# Altium PCB Copy of ASCIIPCB2.pcbdoc (part 1 of 2)
Units mm, origin at the board's own origin, x right, y up, seen from the top; angles counter-clockwise.
Board outline 98.81 x 68.1 mm, 4 copper layers (Top Layer, Signal Layer 1, Signal Layer 2, Bottom Layer), stack 0.778 mm thick; 113 components, 59 nets, 280 pads, 406 vias.
Unrouted connection lines stored in the file: 16.
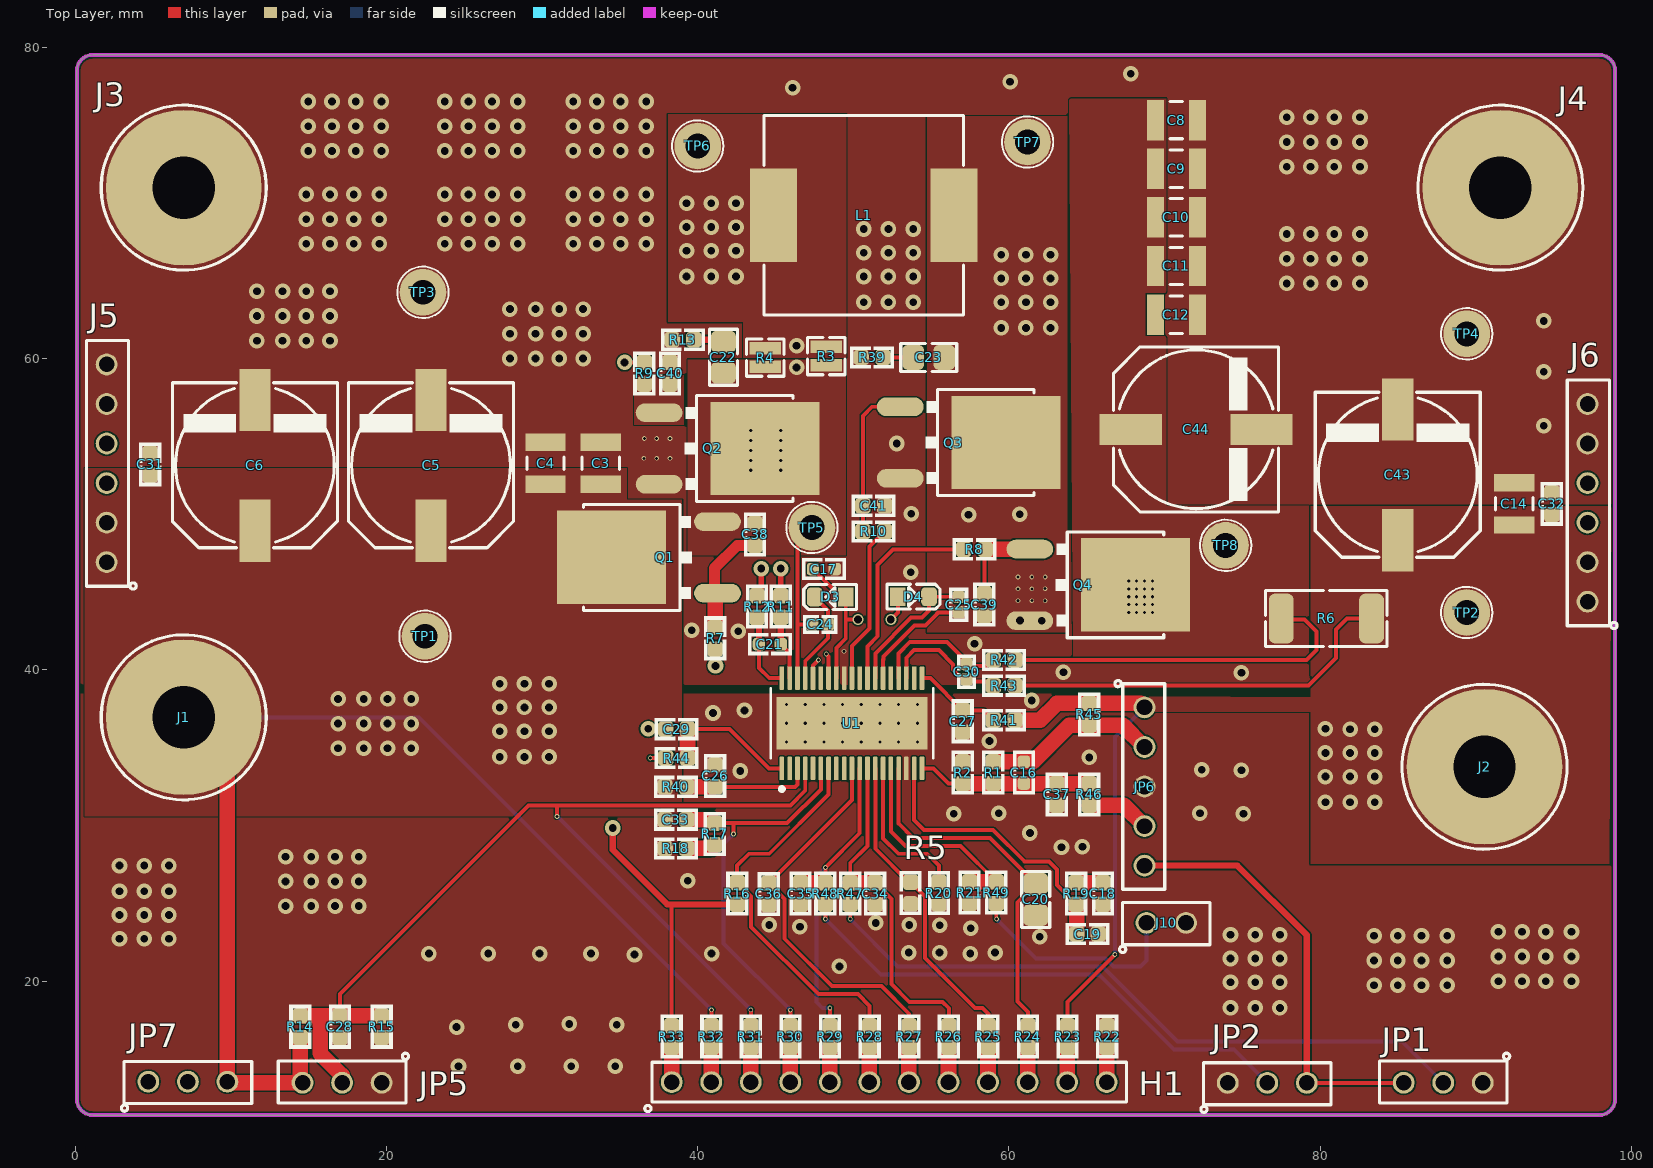
[diagram p0: Top Layer view]
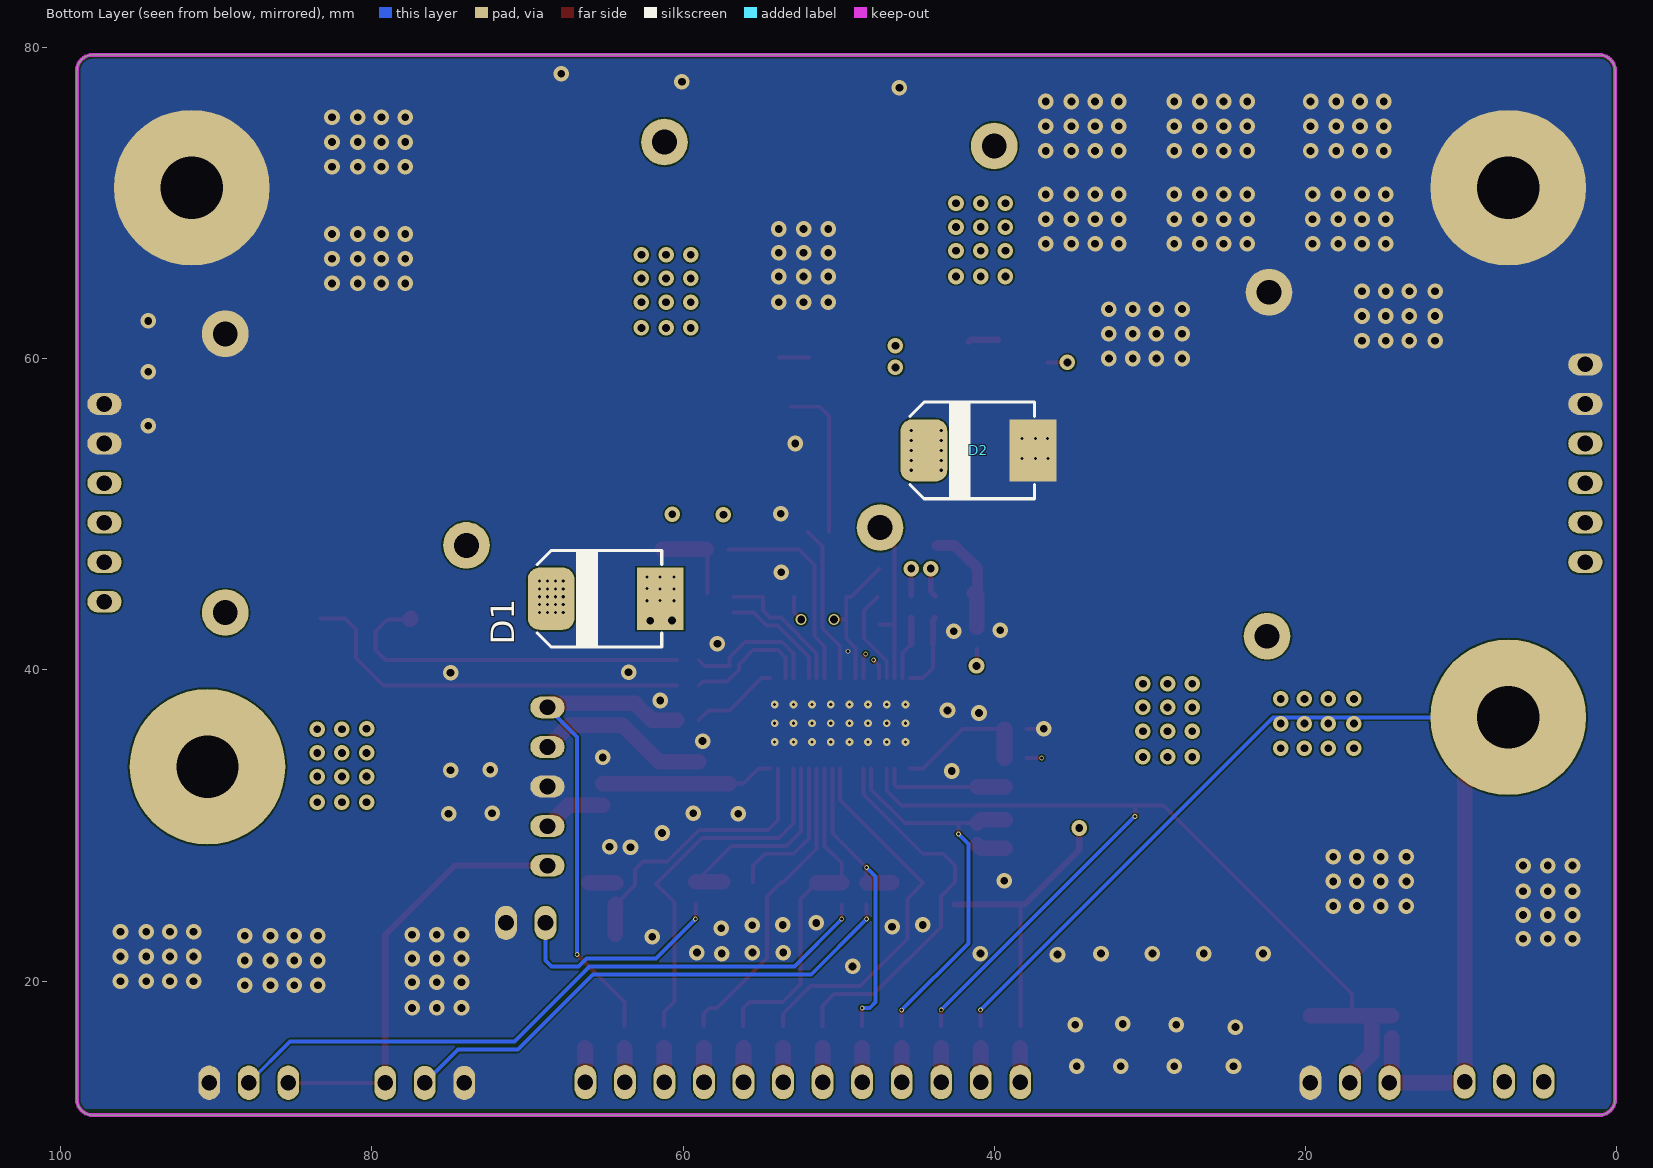
[diagram p1: Bottom Layer view, seen from below]
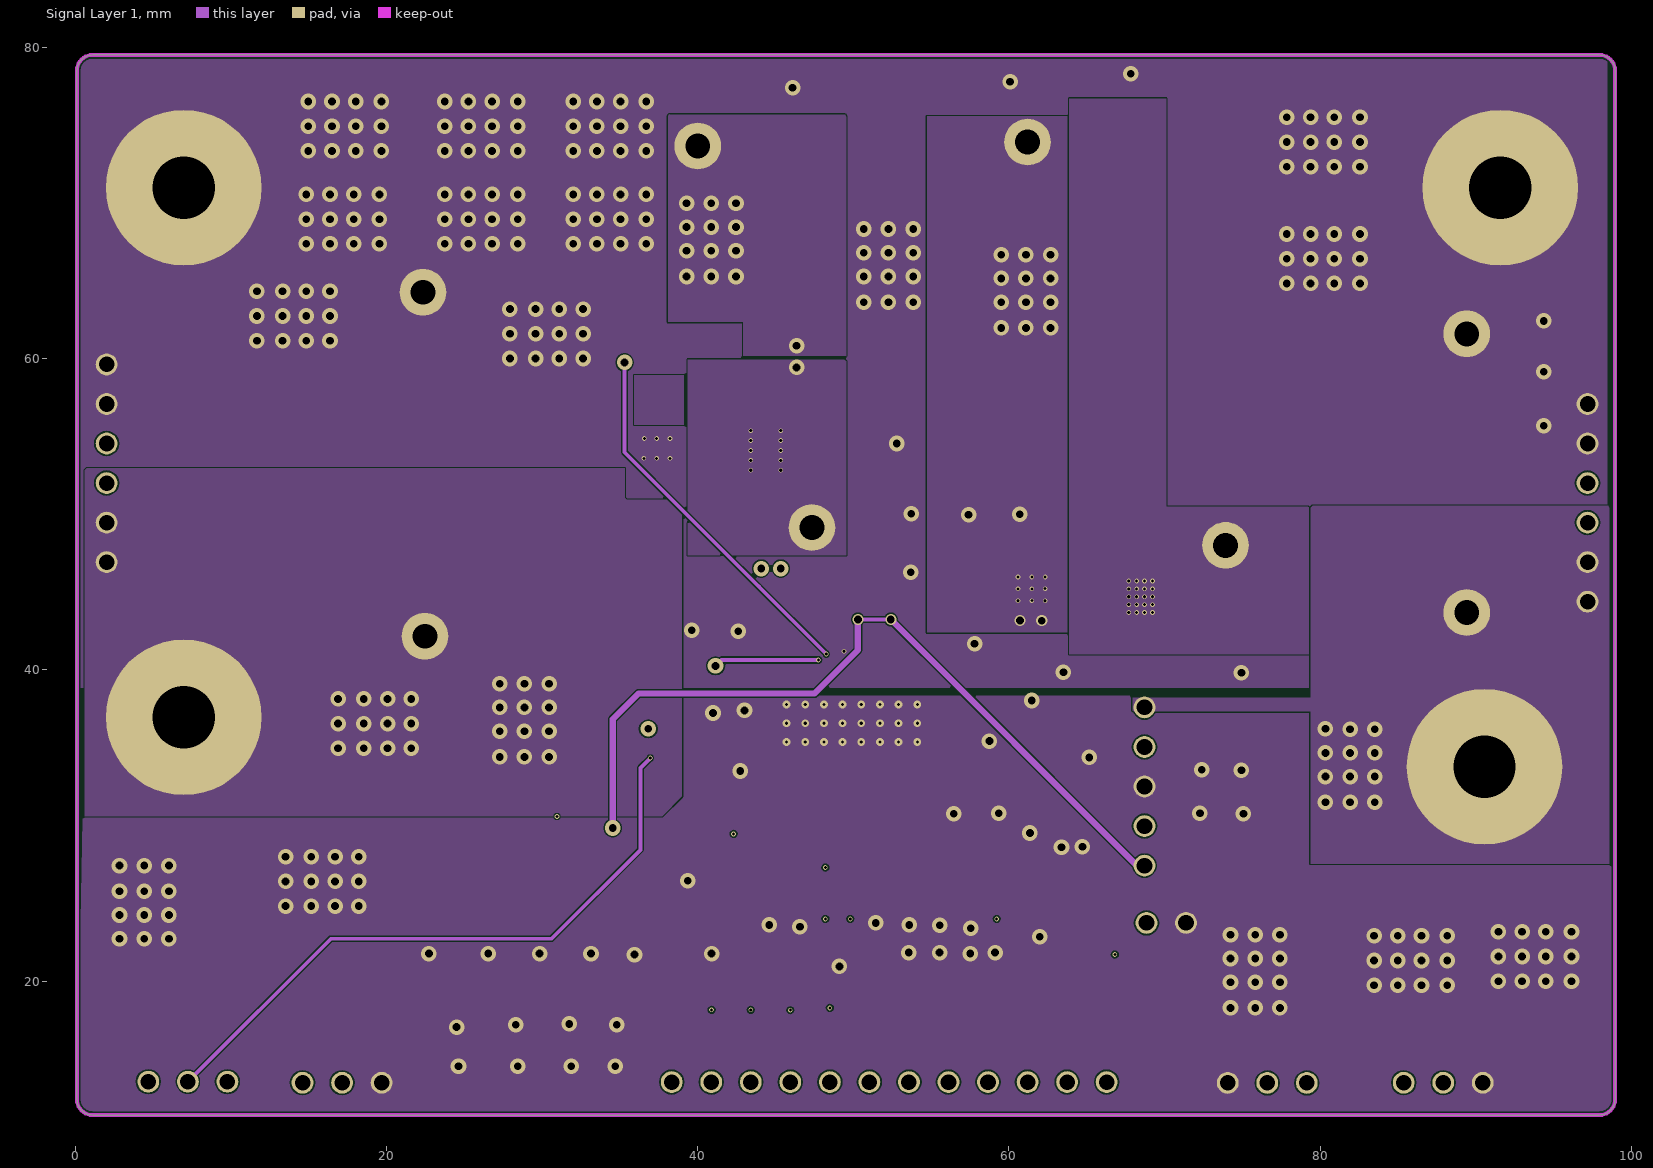
[diagram p2: Signal Layer 1]
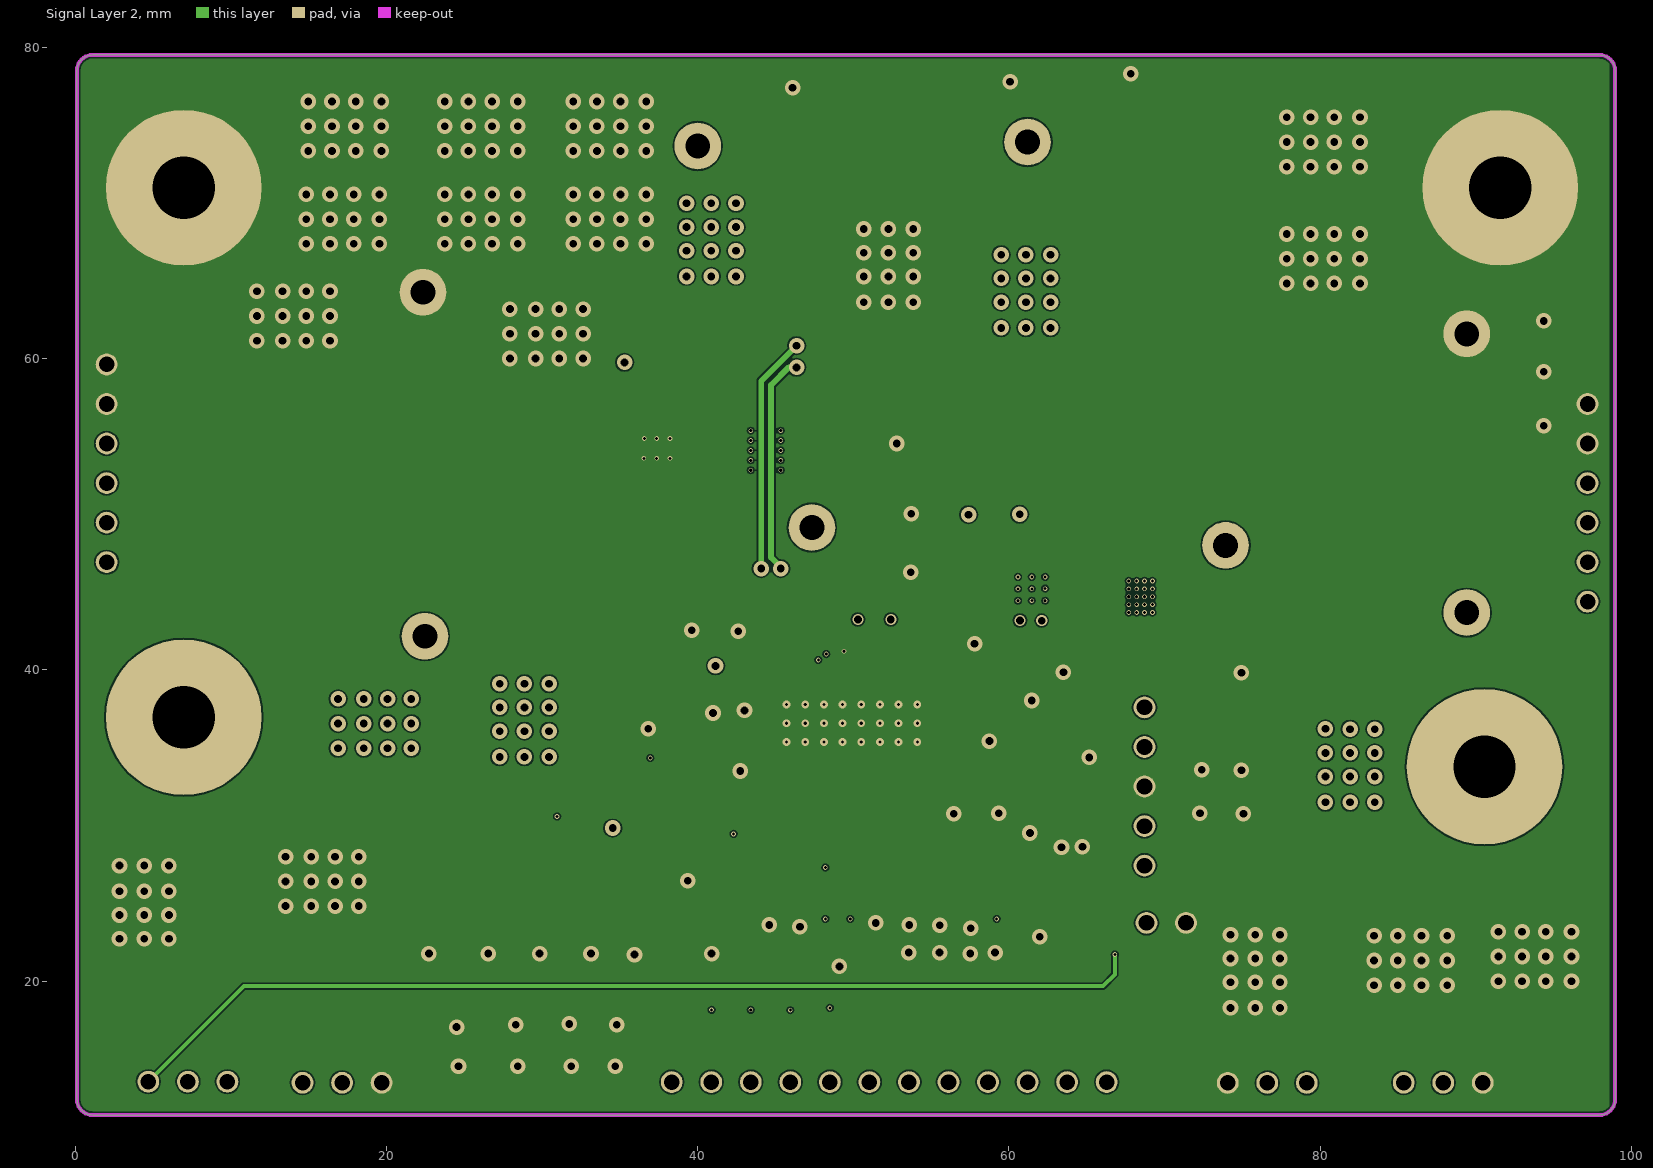
[diagram p3: Signal Layer 2]

## Layer stack, top to bottom
Top Solder: solder mask 0.0102, Solder Resist, Dk 3.5
Top Layer: signal copper 0.0356
Dielectric 1: core 0.254, FR-4, Dk 4.2
Signal Layer 1: signal copper 0.036
Dielectric 3: prepreg 0.127, Dk 4.2
Signal Layer 2: signal copper 0.036
Dielectric 2: core 0.254, Dk 4.2
Bottom Layer: signal copper 0.0356
Bottom Solder: solder mask 0.0102, Solder Resist, Dk 3.5

## Board outline
1.128,11.41 cw(c1.128,12.41) 0.127,12.41 0.127,78.506 cw(c1.128,78.506) 1.128,79.507 97.932,79.507 cw(c97.932,78.506) 98.933,78.506 98.933,12.41 cw(c97.932,12.41) 97.932,11.41
cut-out: 0.254,0 0.508,0 0.508,0.254 0.254,0.254
cut-out: 0.254,0 0.508,0 0.508,0.254 0.254,0.254

## Design rules (kind name [scope] priority, off if disabled: settings)
Clearance Clearance_LM5177 [InComponent('U1') vs InComponent('U1')] p1: gap=0.2 ignorepadtopadclearanceinfootprint=FALSE except(0: Arc-Hole Track-Hole SMDPad-Hole THPad-Hole Via-Hole Fill-Hole Poly-Hole Region-Hole Text-Hole)
Clearance [All] p2: gap=0.1 ignorepadtopadclearanceinfootprint=TRUE except(0: Arc-Hole Track-Hole SMDPad-Hole THPad-Hole Via-Hole Fill-Hole Poly-Hole Region-Hole Text-Hole)
DiffPairsRouting DiffPair_DiffPairsRouting [InDifferentialPair ('NewDifferentialPair1')] p1: maxlimit=0.254 minlimit=0.2 mostfreqgap=0.254 toplayer_minwidth=0.254 toplayer_maxwidth=0.381 toplayer_prefwidth=0.381 midlayer1_minwidth=0.254 midlayer1_maxwidth=0.381 midlayer1_prefwidth=0.381 midlayer2_minwidth=0.254 midlayer2_maxwidth=0.381 midlayer2_prefwidth=0.381 bottomlayer_minwidth=0.254 bottomlayer_maxwidth=0.381 bottomlayer_prefwidth=0.381 maxuncoupledlength=12.7
DiffPairsRouting [All] p2: maxlimit=0.254 minlimit=0.2 mostfreqgap=0.254 toplayer_minwidth=0.254 toplayer_maxwidth=0.381 toplayer_prefwidth=0.381 midlayer1_minwidth=0.254 midlayer1_maxwidth=0.381 midlayer1_prefwidth=0.381 midlayer2_minwidth=0.254 midlayer2_maxwidth=0.381 midlayer2_prefwidth=0.381 bottomlayer_minwidth=0.254 bottomlayer_maxwidth=0.381 bottomlayer_prefwidth=0.381 maxuncoupledlength=12.7
HoleSize [All] p1: absolutevalues=TRUE maxlimit=5 minlimit=0.025 maxpercent=80.000 minpercent=20.000
MatchedLengths DiffPair_MatchedLengths [InDifferentialPair ('NewDifferentialPair1')] p1: tolerance=25.4 checknetsindiffpair=FALSE checkdiffpairvsdiffpair=TRUE checkxsignals=TRUE checkothers=TRUE
MinimumSolderMaskSliver MinimumSolderMaskSliver_C0603D [HasFootprint('C0603D') vs HasFootprint('C0603D')] p1 off: minsoldermaskwidth=0
MinimumSolderMaskSliver [All] p2 off: minsoldermaskwidth=0.254
PolygonConnect [All] p1: connectstyle=Direct reliefconductorwidth=0.254 reliefentries=4 polygonreliefangle="90 Angle" airgapwidth=0.254
RoutingVias [All] p1: holewidth=0.711 width=1.27 viastyle="Through Hole" minholewidth=0.1 minwidth=0.1 maxholewidth=4 maxwidth=4
SilkToSolderMaskClearance SilkToSolderMaskClearance_C0603D [HasFootprint('C0603D') vs HasFootprint('C0603D')] p1 off: minsilkscreentomaskgap=0 clearancetoexposedcopper=TRUE
SilkToSolderMaskClearance [IsPad] p2 off: minsilkscreentomaskgap=0.254 clearancetoexposedcopper=TRUE
SolderMaskExpansion [All] p1: expansion=0.102
Width [All] p1: maxlimit=30 minlimit=0.254 preferedwidth=0.254 minimp=50.000000 maximp=50.000000 favimp=50.000000
26 further rules are at their usual default settings.

## Components (designator, comment, footprint, x,y, rotation, side; value= is the part's Value field where it differs from the comment)
C3 "GCM32EC71H106KA03L" C1210 33.782,53.276 r270 top value=10礔
C4 "GCM32EC71H106KA03L" C1210 30.226,53.276 r270 top value=10礔
C5 "100uF" C_EL_D10L10 22.873,53.149 r90 top
C6 "100uF" C_EL_D10L10 11.557,53.149 r90 top
C8 "GCM32EC71H106KA03L" C1210 70.752,75.329 r180 top value=10礔
C9 "GCM32EC71H106KA03L" C1210 70.752,72.202 r180 top value=10礔
C10 "GCM32EC71H106KA03L" C1210 70.752,69.078 r180 top value=10礔
C11 "GCM32EC71H106KA03L" C1210 70.752,65.951 r180 top value=10礔
C12 "GCM32EC71H106KA03L" C1210 70.752,62.824 r180 top value=10礔
C14 "GCM32EC71H106KA03L" C1210 92.456,50.673 r270 top value=10礔
C16 "GRM1885C2A200JA01D" C0603S 60.96,33.401 r270 top value=20pF
C17 "GRM188R60J476ME15D" C0603S 48.111,46.482 r180 top value=47uF
C18 "18nF" C0603D 66.04,25.638 r90 top
C19 "220pF" C0603D 65.044,23.036 r180 top
C20 "GCM21B5C1H183JA16L" C0805D 61.722,25.257 r90 top value=18nF
C21 "GCM1885C1H101JA16J" C0603S 44.639,41.656 r0 top value=100pF
C22 "GRM2165C1H681JA01D" C0805D 41.656,60.087 r270 top value=680pF
C23 "GRM2165C1H681JA01D" C0805D 54.848,60.079 r0 top value=680pF
C24 "0402BB104KW500" C0402D 47.871,42.926 r0 top value=0.1uF
C25 "0402BB104KW500" C0402D 56.769,44.196 r90 top value=0.1uF
C26 "GCM188L81H104KA57D" C0603D 41.128,33.197 r90 top
C27 "GCM188L81H104KA57D" C0603D 57.023,36.703 r270 top
C28 "GCM188L81H104KA57D" C0603D 17.018,17.08 r270 top
C29 "GCM188L81H104KA57D" C0603D 38.65,36.195 r0 top
C30 "0402BB104KW500" C0402D 57.273,39.879 r90 top value=0.1uF
C31 "GCM188L81H104KA57D" C0603D 4.826,53.211 r90 top
C32 "GCM188L81H104KA57D" C0603D 94.869,50.673 r90 top
C33 "06031C222JAT2A" C0603D 38.6,30.386 r0 top value=2200pF
C34 "06031C102JAT2A" C0603D 51.4,25.638 r270 top value=1000pF
C35 "06031C102JAT2A" C0603D 46.609,25.638 r270 top value=1000pF
C36 "06031C102JAT2A" C0603D 44.574,25.613 r270 top value=1000pF
C37 "GRM1885C1H151JA01D" C0603D 63.073,32.001 r270 top value=150pF
C38 "GRM188R72A103KA01D" C0603D 43.688,48.703 r90 top value=0.01uF
C39 "GRM188R72A103KA01D" C0603D 58.42,44.196 r90 top value=0.01uF
C40 "GRM188R72A103KA01D" C0603D 38.224,59.055 r270 top value=0.01uF
C41 "GRM188R72A103KA01D" C0603D 51.308,50.546 r180 top value=0.01uF
C43 "100uF" C_EL_D10L10 84.976,52.537 r90 top
C44 "100uF" C_EL_D10L10 72.022,55.458 r0 top
D1 "B560C" D_SMC 64.968,44.577 r0 bottom
D2 "B560C" D_SMC 41.021,54.102 r0 bottom
D3 "PMEG6010" D_SOD323 48.514,44.69 r180 top
D4 "PMEG6010" D_SOD323 53.864,44.704 r0 top
H1 "" HDR_F_1X12 52.304,13.525 r0 top
J1 "108-0740-001" BNANASKT_L_RED 6.985,36.957 r270 top
J2 "108-0740-001" BNANASKT_L_RED 90.551,33.782 r180 top
J3 "108-0740-001" BNANASKT_L_BLK 6.985,70.985 r0 top
J4 "108-0740-001" BNANASKT_L_BLK 91.567,70.985 r0 top
J5 "61300611121" HDR_F_1X6 2.032,53.276 r90 top
J6 "61300611121" HDR_F_1X6 97.168,50.736 r90 top
J10 "61300211121" HDR_F_1X2 70.104,23.749 r0 top
JP1 "61300311121" HDR_F_1X3 87.897,13.482 r180 top
JP2 "61300311121" HDR_F_1X3 76.594,13.47 r0 top
JP5 "61300311121" HDR_F_1X3 17.158,13.482 r180 top
JP6 "61300511121" HDR_F_1X5 68.707,32.512 r270 top
JP7 "61300311121" HDR_F_1X3 7.252,13.548 r0 top
L1 "APZBX1265M2R8" L_12 50.673,69.215 r0 top value=2.8uH
Q1 "NCEP0178AK" DPAK_3 41.275,47.23 r90 top
Q2 "NCEP0178AK" DPAK_3 37.523,54.229 r270 top
Q3 "NCEP0178AK" DPAK_3 53.017,54.61 r270 top
Q4 "NCEP0178AK" DPAK_3 61.341,45.466 r270 top
R1 "RC0603FR-0771K5L" R0603D 58.99,33.401 r270 top value=71.5k
R2 "4.75kΩ" R0603D 57.031,33.401 r270 top
R3 "KRL2012E-M-R004-F-T5" R0508 48.26,60.163 r90 top value=4m
R4 "KRL2012E-M-R004-F-T5" R0508 44.341,60.071 r90 top value=4m
R5 "RC0603FR-078K25L" R0603D 53.68,25.671 r90 top value=8.25k
R6 "6mΩ" R2512 80.391,43.307 r0 top
R7 "CRCW06033R00JNEA" R0603D 41.128,42.037 r90 top value=3.0
R8 "CRCW06033R00JNEA" R0603D 57.785,47.752 r0 top value=3.0
R9 "CRCW06033R00JNEA" R0603D 36.576,59.055 r90 top value=3.0
R10 "CRCW06033R00JNEA" R0603D 51.308,48.895 r0 top value=3.0
R11 "CRCW0603100RFKEAHP" R0603D 45.339,44.069 r90 top value=100
R12 "CRCW0603100RFKEAHP" R0603D 43.815,44.069 r90 top value=100
R13 "CRCW06033R00JNEA" R0603D 39.054,61.214 r0 top value=3.0
R14 "178kΩ" R0603D 14.478,17.08 r270 top
R15 "23.2kΩ" R0603D 19.698,17.08 r90 top
R16 "RT0603BRD0710KL" R0603D 42.549,25.638 r90 top value=10.0k
R17 "60kΩ" R0603D 41.09,29.464 r90 top
R18 "RMCF0603ZT0R00" R0603D 38.6,28.534 r0 top value=0
R19 "4.99kΩ" R0603D 64.319,25.638 r270 top
R20 "69.8kΩ" R0603D 55.499,25.663 r90 top
R21 "75kΩ" R0603D 57.466,25.694 r90 top
R22 "RMCF0603ZT0R00" R0603D 66.307,16.441 r270 top value=0
R23 "RMCF0603ZT0R00" R0603D 63.764,16.441 r270 top value=0
R24 "RMCF0603ZT0R00" R0603D 61.222,16.441 r270 top value=0
R25 "RMCF0603ZT0R00" R0603D 58.677,16.441 r270 top value=0
R26 "RMCF0603ZT0R00" R0603D 56.134,16.441 r270 top value=0
R27 "RMCF0603ZT0R00" R0603D 53.591,16.441 r270 top value=0
R28 "RMCF0603ZT0R00" R0603D 51.049,16.441 r270 top value=0
R29 "RMCF0603ZT0R00" R0603D 48.506,16.441 r270 top value=0
R30 "RMCF0603ZT0R00" R0603D 45.961,16.441 r270 top value=0
R31 "RMCF0603ZT0R00" R0603D 43.419,16.441 r270 top value=0
R32 "RMCF0603ZT0R00" R0603D 40.876,16.441 r270 top value=0
R33 "RMCF0603ZT0R00" R0603D 38.334,16.441 r270 top value=0
R39 "CRCW06033R00JNEA" R0603D 51.211,60.079 r0 top value=3.0
R40 "RMCF0603ZT0R00" R0603D 38.6,32.492 r180 top value=0
R41 "RMCF0603ZT0R00" R0603D 59.69,36.774 r0 top value=0
R42 "RMCF0603ZT0R00" R0603D 59.69,40.64 r0 top value=0
R43 "RMCF0603ZT0R00" R0603D 59.69,38.989 r0 top value=0
R44 "RMCF0603ZT0R00" R0603D 38.65,34.343 r180 top value=0
R45 "RC0603FR-0710RL" R0603D 65.151,37.149 r90 top value=10.0
R46 "RMCF0603ZT0R00" R0603D 65.151,32.004 r270 top value=0
R47 "RMCF0603ZT0R00" R0603D 49.803,25.638 r90 top value=0
R48 "RMCF0603ZT0R00" R0603D 48.206,25.638 r90 top value=0
R49 "RMCF0603ZT0R00" R0603D 59.183,25.694 r270 top value=0
TP1 "5010" TPTHD_C_BLK1 22.479,42.164 r180 top
TP2 "5013" TPTHD_C_BLK1 89.408,43.688 r0 top
TP3 "5011" TPTHD_C_BLK1 22.352,64.262 r180 top
TP4 "5011" TPTHD_C_BLK1 89.408,61.595 r0 top
TP5 "5012" TPTHD_C_BLK1 47.34,49.149 r0 top
TP6 "5012" TPTHD_C_BLK1 40.005,73.66 r0 top
TP7 "5128" TPTHD_C_BLK1 61.194,73.914 r0 top
TP8 "5013" TPTHD_C_BLK1 73.914,48.006 r0 top
U1 "LM5177DCPR" SOG50_38T 49.911,36.576 r90 top

## Footprints (in the part's own frame and the unit in brackets; to place one, negate y for a bottom-side part, rotate by r counter-clockwise, add the part's x,y. Pads: shape width x height; smd on the part's side, far side on the other; paste and mask are expansions set on the pad)
BNANASKT_L_BLK [mm] "Banana socket long black"
  round 10 hole 4: 1(0,0)
  silkscreen extent -5.3,-5.3 5.3,5.3, body extent -5.6,-5.6 5.6,12.01, height 21.64
BNANASKT_L_RED [mm] "Banana socket long Red"
  round 10 hole 4: 1(0,0)
  silkscreen extent -5.3,-5.3 5.3,5.3, body extent -5.6,-5.6 5.6,12.01, height 21.64
C0402D [mm] "CHIP Capacitor, 1.0X0.5mm, 0402, SMD (SolderMask Defined)"
  rrect50% 0.8x0.8 smd paste-2 mask-0.1: 1(-0.5,0) 2(0.5,0)
  silkscreen extent -1.1,-0.6 1.1,0.6, body extent -0.5,-0.26 0.5,0.27, height 0.36
C0603D [mm] "CHIP Capacitor, 1.6X0.8mm, 0603 , SMD (SolderMask Defined)"
  rrect50% 1x1 smd paste-0.5 mask-0.1: 1(-0.7,0) 2(0.7,0)
  silkscreen extent -1.4,-0.7 1.4,0.7, body extent -0.8,-0.4 0.8,0.4, height 0.9
C0603S [mm] "CHIP Capacitor, 1.6X0.8mm, 0603, soldered"
  rrect50% 0.8x0.8 smd paste-5 mask+0.075: 1(-0.7,0) 2(0.7,0)
  silkscreen extent -1.4,-0.7 1.4,0.7, body extent -1.23,-0.4 1.23,0.4, height 0.8
C0805D [mm] "CHIP Capacitor, 2.0X1.3mm, 0805, SMD (SolderMask Defined)"
  rrect50% 1.4x1.6 smd paste-5 mask-0.2: 1(-1,0) 2(1,0)
  silkscreen extent -1.8,-0.9 1.8,0.9, body extent -1,-0.62 1,0.63, height 1
C1210 [mm] "Chip Capacitor, Body 3.2x2.5mm, IPC High Density"
  rect 1.1x2.6 smd: 1(-1.35,0) 2(1.35,0)
  silkscreen extent -0.4,-1.2 0.4,1.2, body extent -1.7,-1.35 1.7,1.35, height 1.3
C_EL_D10L10 [mm] "Electrolytic Cap, 10.3mm, L: 10.2mm, size G"
  rect 4x2 smd paste-0.215: 1(-4.2,0) 2(4.2,0)
  silkscreen extent -5.3,-5.3 5.3,5.3, body extent -5.9,-5.25 5.9,5.25, height 10.5
D_SMC [mm] "SMC, Molded Diode, 7.0x6.0mm"
  rect 3x4 smd paste-3: 1(-3.5,0)
  rrect50% 3x4 smd paste-3: 2(3.5,0)
  silkscreen extent -3.6,-3.1 4.4,3.1, body extent -4.07,-3.05 4.06,3.05, height 2.4
D_SOD323 [mm] "DIODE0805, SOD-323, SC-76, DL-35, 0805 similar size"
  rect 1x1.2 smd paste-2 mask+0.075: 1(-1,0)
  rrect50% 1x1.2 smd paste-2 mask+0.075: 2(1,0)
  silkscreen extent -1.7,-0.8 1.7,0.8, body extent -1.25,-0.68 1.25,0.67, height 1
DPAK_3 [mm] "D-PAK (TO-252), 3-Pads, Body 6.2x6.7mm"
  oval 1.2x3 smd: 1(-2.3,0) 3(2.3,0)
  rect 6x7 smd paste-5: 4(0,6.8)
  silkscreen extent -3.4,1.63 3.4,8.6, body extent -3.37,-0.5 3.37,9.6, height 2.37
HDR_F_1X2 [mm] "HEADER FEMALE pitch: 2.54mm"
  round 1.4 / inner round 1.4 / far side oval 1.4x2.2 hole 1 mask+0.1: 1(-1.27,0) 2(1.27,0)
  silkscreen extent -3,-1.9 2.8,1.3, body extent -2.66,-1.3 2.67,1.2, height 8.5
HDR_F_1X3 [mm] "HEADER FEMALE pitch: 2.54mm"
  round 1.4 / inner round 1.4 / far side oval 1.4x2.2 hole 1 mask+0.1: 1(-2.54,0) 2(0,0) 3(2.54,0)
  silkscreen extent -4.27,-1.9 4.1,1.3, body extent -3.93,-1.3 3.94,1.2, height 8.5
HDR_F_1X5 [mm] "HEADER FEMALE pitch: 2.54mm"
  round 1.4 / inner round 1.4 / far side oval 1.4x2.2 hole 1 mask+0.1: 1(-5.08,0) 2(-2.54,0) 3(0,0) 4(2.54,0) 5(5.08,0)
  silkscreen extent -6.81,-1.9 6.6,1.3, body extent -6.47,-1.3 6.48,1.2, height 8.5
HDR_F_1X6 [mm] "HEADER FEMALE pitch: 2.54mm"
  round 1.4 / inner round 1.4 / far side oval 1.4x2.2 hole 1 mask+0.1: 1(-6.35,0) 2(-3.81,0) 3(-1.27,0) 4(1.27,0) 5(3.81,0) 6(6.35,0)
  silkscreen extent -8.08,-1.9 7.9,1.3, body extent -7.74,-1.3 7.75,1.2, height 8.5
HDR_F_1X12 [mm]
  round 1.4 / inner round 1.4 / far side oval 1.4x2.2 hole 1: 1(-13.97,0) 2(-11.43,0) 3(-8.89,0) 4(-6.35,0) 5(-3.81,0) 6(-1.27,0) 7(1.27,0) 8(3.81,0) 9(6.35,0) 10(8.89,0) 11(11.43,0) 12(13.97,0)
  silkscreen extent -15.7,-1.9 15.24,1.27, body extent -15.24,-1.27 15.24,1.27, height 8.5
L_12 [mm] "INDUCTOR, 13.5x12.5mm, DR125, CDRH127, D128C 931AS"
  rect 3x6 smd paste-4: 1(-5.8,0) 2(5.8,0)
  silkscreen extent -6.4,-6.4 6.4,6.4, body extent -6.16,-6.15 6.16,6.15, height 8.16
R0508 [mm] "CHIP Resistor, 1.3X2.0mm, 0508"
  rect 0.8x2 smd: 1(-0.6,0) 2(0.6,0)
  silkscreen extent -1.2,-1.2 1.2,1.2, body extent -0.67,-1.05 0.68,1.05, height 0.7
R0603D [mm] "CHIP Resistor 1/10 WATT, 1.6x0.8mm, 0603, SMD (SolderMask Defined)"
  rrect50% 1x1 smd paste-0.5 mask-0.1: 1(-0.7,0) 2(0.7,0)
  silkscreen extent -1.4,-0.7 1.4,0.7, body extent -0.85,-0.4 0.85,0.4, height 0.56
R2512 [mm] "CHIP RESISTOR 1 WATT, 6.4X3.2mm, 2512, 6432"
  rrect50% 1.6x3.2 smd: 1(-2.9,0) 2(2.9,0)
  silkscreen extent -3.9,-1.8 3.9,1.8, body extent -3.17,-1.5 3.18,1.5, height 1.6
SOG50_38T [mm]
  rrect33% 1.5x0.3 smd paste+0 mask+0: 1(-2.9,4.5) 2(-2.9,4) 3(-2.9,3.5) 4(-2.9,3) 5(-2.9,2.5) 6(-2.9,2) 7(-2.9,1.5) 8(-2.9,1) 9(-2.9,0.5) 10(-2.9,0) 11(-2.9,-0.5) 12(-2.9,-1) 13(-2.9,-1.5) 14(-2.9,-2) 15(-2.9,-2.5) 16(-2.9,-3) 17(-2.9,-3.5) 18(-2.9,-4) 19(-2.9,-4.5) 20(2.9,-4.5) 21(2.9,-4) 22(2.9,-3.5) 23(2.9,-3) 24(2.9,-2.5) 25(2.9,-2) 26(2.9,-1.5) 27(2.9,-1) 28(2.9,-0.5) 29(2.9,0) 30(2.9,0.5) 31(2.9,1) 32(2.9,1.5) 33(2.9,2) 34(2.9,2.5) 35(2.9,3) 36(2.9,3.5) 37(2.9,4) 38(2.9,4.5)
  rrect3% 3.4x9.7 smd paste-1000 mask-1000: 39(0,0)
  silkscreen extent -4.35,-5.23 2.25,5.23, body extent -3.75,-5.15 3.75,5.15, height 0.25
TPTHD_C_BLK1 [mm] "Thru-hole test point loop, 1.6mm Hole"
  round 3 hole 1.6: 1(0,0)
  silkscreen extent -1.65,-1.65 1.65,1.65, body extent -1.6,-1.6 1.6,1.59, height 8.09

## Part data
C3 C4 C8 C9 C10 C11 C12 C14: library part CMP-0092251-1, "Ceramic Capacitor for Automotive 10uF -10% 50VDC X7S 1210 Embossed T/R", Manufacturer=Murata, Operating Temperature Range="-55癈 to +125癈", TempCo=22%, Temperature Characteristic=X7S, Tolerance_%=10%, ValueDisplayed=10uF, AddInBom=yes, AEC Grade="Grade 1", AEC Qualified=Yes, Cap_F=10礔, ComponentLink1Description=Datasheet, ComponentLink1URL=https://www.murata.com/en-us/products/productdetail?partno=GCM32EC71H106KA03%23, Datasheet=https://www.murata.com/en-us/products/productdetail?partno=GCM32EC71H106KA03%23, Datasheet Path=datasheets/Cap-GCM32EC71H106KA03L.pdf, DesignItemID=CMP-0092251-1, Device=CMP-0092251-1, FootprintName=FP-GCM32EC71H106KA03L_1210-MFG, helpURL=https://upverter.com/upn/revision/edd6109eef88ffd0/, Lead Free=Yes, LibraryName="Altium Vault - TI", Origin Footprint=FP-GCM32EC71H106KA03L_1210-IPC_C, OriginFootprint 2=FP-GCM32EC71H106KA03L_1210-IPC_B, OriginFootprint 3=FP-GCM32EC71H106KA03L_1210-IPC_A, OriginModelName=Cap_GCM32EC71H106KA03L_1210, PackageReference=1210, Part Number=GCM32EC71H106KA03L, PartNumber=GCM32EC71H106KA03L, RoHS=TRUE, SizeZ_mm=2.7mm, Symbol=CMP-0092251-1, VDC_V=50V
  C3: UniqueId=cc82bf2c2e22e605
  C4: UniqueId=3a68d3ddabf48558
  C8: UniqueId=80f3708378e3d903
  C9: UniqueId=7ddfd2f632a8b17d
  C10: UniqueId=3e75135af30e0f04
  C11: UniqueId=20764de07767b3a1
  C12: UniqueId=26a39bcafcc8ce7c
  C14: UniqueId=00361082df9d4549
C5 C6 C43 C44: library part MA63V100M10X10, "容值:100uF;精度:±20%;额定电压:63V;纹波电流:3.1A@100kHz;等效串联电阻(ESR):30mΩ@100kHz;类型:聚合物;"
C16: library part CMP-0007253-4, "CAP, CERM, 20 pF, 100 V, +/- 5%, C0G/NP0, 0603", Cap_Case=0603, Manufacturer=MuRata, Supplier Part Number 1=490-1334-1-ND, TempCo=C0G/NP0, Tolerance_%=5%, Value1=Unknown, Value2=100V, ValueDisplayed=20pF, AddInBom=yes, AEC Category=Q200, AEC Qualified=?, Cap_F=20pF, ComponentLink1Description="Datasheet link", ComponentLink1URL=http://search.murata.co.jp/Ceramy/PnsearchViewAction.do?HnOFG=ON&HnNFG=ON&SEL_CNT=50&sLang=en&sKey=GRM1885C2A200JA01D&x=9&y=9&search=startwith, CompType=Capacitor, DesignItemID=CMP-0007253-4, Device=CMP-0007253-4, FootprintName=0603S, LatestRevisionDate=2017-03-09, LibraryName="Altium Vault - TI", MountType=SMT, Origin Footprint=0603, OriginFootprint 2=0603_HV, OriginFootprint 3=0603L, OriginFootprint 4=0603M, PackageReference=0603, PartNumber=GRM1885C2A200JA01D, Polarized=N, Published=2008-06-19, Publisher="Texas Instruments", RoHS=Y, SizeArea_mm2=1.28, SizeAreaWB_mm2=4.68, SizeX_mm=1.6, SizeY_mm=0.8, SizeZ_mm=1, Supplier 1=Digi-Key, Supplier 2=Mouser, Supplier Part Number 2=81-GRM1885C2A200JA1D, Symbol=CMP-0007253-4, TaMax_C=125癈, TaMin_C=-55癈, Technology=Ceramic, U/M=EA, UniqueId=c8e923f96b539988, VDC_V=100V
C17: library part CMP-0007313-5, "CAP, CERM, 47 uF, 6.3 V, +/- 20%, X5R, 0603", Cap_Case=0603, Manufacturer=MuRata, TempCo=X5R, Tolerance_%=20%, Value1=Unknown, Value2=6.3V, ValueDisplayed=47uF, AddInBom=yes, AEC Category=Q200, AEC Qualified=?, Cap_F=47礔, ComponentLink1Description="Datasheet link", ComponentLink1URL=http://psearch.en.murata.com/capacitor/product/GRM188R60J476ME15%23.pdf, CompType=Capacitor, DesignItemID=CMP-0007313-5, Device=CMP-0007313-5, FootprintName=0603S, LatestRevisionDate=2017-03-09, LibraryName="Altium Vault - TI", MountType=SMT, Origin Footprint=0603, OriginFootprint 2=0603_HV, OriginFootprint 3=0603L, OriginFootprint 4=0603M, PackageReference=0603, PartNumber=GRM188R60J476ME15D, Polarized=N, Published=2008-06-19, Publisher="Texas Instruments", RoHS=Y, SizeArea_mm2=1.28, SizeAreaWB_mm2=4.68, SizeX_mm=1.6, SizeY_mm=0.8, SizeZ_mm=1, Symbol=CMP-0007313-5, TaMax_C=85癈, TaMin_C=-55癈, Technology=Ceramic, U/M=EA, UniqueId=48700c84863a802e, VDC_V=6.3V
C18: library part CC0603KRX7R9BB183, "容值:18nF;精度:±10%;额定电压:50V;温度系数:X7R;", JLCPCB Part Class="Extended Part", LCSC Part Name="18nF ±10% 50V", Manufacturer=YAGEO(国巨), Temperature Coefficient=X7R, Tolerance=±10%, Voltage Rating=50V, 3D Model=ac125912035d415993ca9572d50418b1, 3D Model Transform=62.992,31.496,0,0,0,0,0,0,0, Add into BOM=yes, Convert to PCB=yes, Datasheet=https://item.szlcsc.com/datasheet/CC0603KRX7R9BB183/108295.html, Device=CC0603KRX7R9BB183, FootprintName=C0603, Manufacturer Part=CC0603KRX7R9BB183, ModelName=C0603_L1.6-W0.8-H0.8, Supplier=LCSC, Supplier Footprint=0603, Supplier Part=C107079, Symbol=CC0603KRX7R9BB183
C19: library part CC0603JRNPO9BN221, "容值:220pF;精度:±5%;额定电压:50V;温度系数:NP0;", JLCPCB Part Class="Extended Part", LCSC Part Name="220pF ±5% 50V", Manufacturer=YAGEO(国巨), Temperature Coefficient=NP0, Tolerance=±5%, Voltage Rating=50V, 3D Model=ac125912035d415993ca9572d50418b1, 3D Model Transform=62.992,31.496,0,0,0,0,0,0,0, Add into BOM=yes, Convert to PCB=yes, Datasheet=https://item.szlcsc.com/datasheet/CC0603JRNPO9BN221/107425.html, Device=CC0603JRNPO9BN221, FootprintName=C0603, Manufacturer Part=CC0603JRNPO9BN221, ModelName=C0603_L1.6-W0.8-H0.8, Supplier=LCSC, Supplier Footprint=0603, Supplier Part=C106210, Symbol=CC0603JRNPO9BN221
C20: library part CMP-0092440-1, "Ceramic Capacitor for Automotive 18nF -5% 50VDC C0G 0805 Embossed T/R", Manufacturer=Murata, Operating Temperature Range="-55癈 to +125癈", TempCo=30ppm/癈, Temperature Characteristic=C0G, Tolerance_%=5%, ValueDisplayed=18nF, AddInBom=yes, AEC Grade="Grade 1", AEC Qualified=Yes, Cap_F=18nF, ComponentLink1Description=Datasheet, ComponentLink1URL=https://www.murata.com/en-us/products/productdetail?partno=GCM21B5C1H183JA16%23, Datasheet=https://www.murata.com/en-us/products/productdetail?partno=GCM21B5C1H183JA16%23, Datasheet Path=datasheets/Cap-GCM21B5C1H183JA16L.pdf, DesignItemID=CMP-0092440-1, Device=CMP-0092440-1, FootprintName=FP-GCM21B5C1H183JA16L_0805-MFG, helpURL=https://upverter.com/upn/revision/286cb77b29c01871/, Lead Free=Yes, LibraryName="Altium Vault - TI", Origin Footprint=FP-GCM21B5C1H183JA16L_0805-IPC_C, OriginFootprint 2=FP-GCM21B5C1H183JA16L_0805-IPC_B, OriginFootprint 3=FP-GCM21B5C1H183JA16L_0805-IPC_A, OriginModelName=Cap_GCM21B5C1H183JA16L_0805, PackageReference=0805, Part Number=GCM21B5C1H183JA16L, PartNumber=GCM21B5C1H183JA16L, RoHS=TRUE, SizeZ_mm=1.4mm, Symbol=CMP-0092440-1, UniqueId=97d7532320e593d5, VDC_V=50V
C21: library part CMP-0750041-1, "CAP, CERM, 100 pF, 50 V,+/- 5%, C0G/NP0, AEC-Q200 Grade 1, 0603", Cap_Case=0603, Manufacturer=MuRata, TempCo=C0G/NP0, Tolerance_%=5%, Value2=50V, ValueDisplayed=100pF, AddInBom=yes, AEC Category=Q200, AEC Grade=1, AEC Qualified=Y, Cap_F=100pF, ComponentLink1Description="Datasheet link", ComponentLink1URL=https://psearch.en.murata.com/capacitor/product/GCM1885C1H101JA16%23.pdf, CompType=Capacitor, DesignItemID=CMP-0750041-1, Device=CMP-0750041-1, FootprintName=0603S, LibraryName="Altium Vault - TI", MountType=SMT, Origin Footprint=0603, OriginFootprint 2=0603M, OriginFootprint 3=0603L, OriginFootprint 4=0603_HV, PackageReference=0603, PartNumber=GCM1885C1H101JA16J, Polarized=N, RoHS=Y, SizeArea_mm2=1.28, SizeAreaWB_mm2=4.68, SizeX_mm=1.6, SizeY_mm=0.8, SizeZ_mm=1, Symbol=CMP-0750041-1, TaMax_C=125癈, TaMin_C=-55癈, Technology=Ceramic, U/M=EA, UniqueId=0259cc883dd91c7a, VDC_V=50V
C22 C23: library part CMP-0008089-2, "CAP, CERM, 680 pF, 50 V, +/- 5%, C0G/NP0, 0805", Cap_Case=0805, Manufacturer=MuRata, Supplier Part Number 1=490-1619-1-ND, TempCo=C0G/NP0, Tolerance_%=5%, Value1=Unknown, Value2=50V, ValueDisplayed=680pF, AddInBom=yes, AEC Category=Q200, AEC Qualified=?, Cap_F=680pF, ComponentLink1Description="Datasheet link", ComponentLink1URL=http://search.murata.co.jp/Ceramy/PnsearchViewAction.do?HnOFG=ON&HnNFG=ON&SEL_CNT=50&sLang=en&sKey=GRM2165C1H681JA01D&x=9&y=9&search=startwith, CompType=Capacitor, DesignItemID=CMP-0008089-2, Device=CMP-0008089-2, FootprintName=0805_HV1, LatestRevisionDate=2017-03-09, LibraryName="Altium Vault - TI", MountType=SMT, Origin Footprint=0805_HV, OriginFootprint 2=0805M, OriginFootprint 3=0805, OriginFootprint 4=0805L, PackageReference=0805, PartNumber=GRM2165C1H681JA01D, Polarized=N, Published=2008-06-19, Publisher="Texas Instruments", RoHS=Y, SizeArea_mm2=2.5, SizeAreaWB_mm2=6.75, SizeX_mm=2, SizeY_mm=1.25, SizeZ_mm=1.45, Supplier 1=Digi-Key, Supplier 2=Mouser, Supplier Part Number 2=81-GRM40C681J50D, Symbol=CMP-0008089-2, TaMax_C=125癈, TaMin_C=-55癈, Technology=Ceramic, U/M=EA, VDC_V=50V
  C22: UniqueId=7f35450ac3171d20
  C23: UniqueId=8bc5c1e1749a19fa
C24 C30: library part CMP-0860983-1, "CAP, CERM, 0.1 礔, 50 V,+/- 10%, X7R, 0402", Cap_Case=0402, Manufacturer="Passive Plus", TempCo=X7R, Tolerance_%=10%, Value2=50V, ValueDisplayed=0.1uF, AddInBom=yes, AEC Category=Q200, AEC Grade=N/A, AEC Qualified=N, Cap_F=100nF, ComponentLink1Description="Datasheet link", ComponentLink1URL=https://www.passiveplus.com/pdf/PPI-0402BB104-KW500.DATASHEET.pdf, CompType=Capacitor, DesignItemID=CMP-0860983-1, Device=CMP-0860983-1, FootprintName=0402S, LibraryName="Altium Vault - TI", MountType=SMT, Origin Footprint=0402, OriginFootprint 2=0402M, OriginFootprint 3=0402L, PackageReference=0402, PartNumber=0402BB104KW500, Polarized=N, RoHS=Y, SizeArea_mm2=0.5, SizeAreaWB_mm2=3, SizeX_mm=1, SizeY_mm=0.5, SizeZ_mm=0.6, Symbol=CMP-0860983-1, TaMax_C=125癈, TaMin_C=-55癈, Technology=Ceramic, U/M=EA, VDC_V=50V
  C24: UniqueId=7c674fedd66d7165
  C30: UniqueId=a2ee6ceb65d30336
C25: library part CMP-0860983-1, "CAP, CERM, 0.1 uF, 50 V,+/- 10%, X7R, 0402", Cap_Case=0402, Manufacturer="Passive Plus", TempCo=X7R, Tolerance_%=10%, Value2=50V, ValueDisplayed=0.1uH, AddInBom=yes, AEC Category=Q200, AEC Grade=N/A, AEC Qualified=N, Cap_F=100nF, ComponentLink1Description="Datasheet link", ComponentLink1URL=https://www.passiveplus.com/pdf/PPI-0402BB104-KW500.DATASHEET.pdf, CompType=Capacitor, DesignItemID=CMP-0860983-1, Device=CMP-0860983-1, FootprintName=0402S, LibraryName="Altium Vault - TI", MountType=SMT, Origin Footprint=0402, OriginFootprint 2=0402M, OriginFootprint 3=0402L, PackageReference=0402, PartNumber=0402BB104KW500, Polarized=N, RoHS=Y, SizeArea_mm2=0.5, SizeAreaWB_mm2=3, SizeX_mm=1, SizeY_mm=0.5, SizeZ_mm=0.6, Symbol=CMP-0860983-1, TaMax_C=125癈, TaMin_C=-55癈, Technology=Ceramic, U/M=EA, UniqueId=d99985aa138ce050, VDC_V=50V
C26 C27: library part CMP-0086535-1, "0.1uF -10% 50V Ceramic Capacitor X8L 0603 (1608 Metric)", Manufacturer="Murata Electronics North America", TempCo=-40+15%, Tolerance_%=10%, AddInBom=yes, AEC Grade="Grade 0", AEC Qualified=Yes, Cap_F=100nF, ComponentLink1Description=Datasheet, ComponentLink1URL=https://search.murata.co.jp/Ceramy/image/img/A01X/G101/ENG/GCM188L81H104KA57-01.pdf, DesignItemID=CMP-0086535-1, Device=CMP-0086535-1, FootprintName=FP-GCM188L81H104KA57D_0603-MFG, LibraryName="Altium Vault - TI", Origin Footprint=FP-GCM188L81H104KA57D_0603-IPC_C, OriginFootprint 2=FP-GCM188L81H104KA57D_0603-IPC_B, OriginFootprint 3=FP-GCM188L81H104KA57D_0603-IPC_A, OriginModelName=Cap_GCM188L81H104KA57D_0603, PackageReference=0603, PartNumber=GCM188L81H104KA57D, RoHS=TRUE, SizeZ_mm=0.9mm, Symbol=CMP-0086535-1, Symbol Name=SYM-GCM188L81H104KA57D, UniqueId=b4693cfd16d534cd, VDC_V=50V
C28 C29 C31 C32: library part CMP-0086535-1, "0.1礔 -10% 50V Ceramic Capacitor X8L 0603 (1608 Metric)", Manufacturer="Murata Electronics North America", TempCo=-40+15%, Tolerance_%=10%, AddInBom=yes, AEC Grade="Grade 0", AEC Qualified=Yes, Cap_F=100nF, ComponentLink1Description=Datasheet, ComponentLink1URL=https://search.murata.co.jp/Ceramy/image/img/A01X/G101/ENG/GCM188L81H104KA57-01.pdf, DesignItemID=CMP-0086535-1, Device=CMP-0086535-1, FootprintName=FP-GCM188L81H104KA57D_0603-MFG, LibraryName="Altium Vault - TI", Origin Footprint=FP-GCM188L81H104KA57D_0603-IPC_C, OriginFootprint 2=FP-GCM188L81H104KA57D_0603-IPC_B, OriginFootprint 3=FP-GCM188L81H104KA57D_0603-IPC_A, PackageReference=0603, PartNumber=GCM188L81H104KA57D, RoHS=TRUE, SizeZ_mm=0.9mm, Symbol=CMP-0086535-1, Symbol Name=SYM-GCM188L81H104KA57D, VDC_V=50V
  C28: OriginModelName=Cap_GCM188L81H104KA57D_0603, UniqueId=e3aeb17489c0ab5d
  C29: OriginModelName=Cap_GCM188L81H104KA57D_0603, UniqueId=5bfcee5f0e3d202c
  C31: Origin 3D Model Title=Cap_GCM188L81H104KA57D_0603
  C32: OriginModelName=Cap_GCM188L81H104KA57D_0603, UniqueId=d2625f4b4bd439ef
C33: library part CMP-0006736-4, "CAP, CERM, 2200 pF, 100 V, +/- 5%, X7R, 0603", Cap_Case=0603, Manufacturer=AVX, Supplier Part Number 1=478-3705-1-ND, TempCo=X7R, Tolerance_%=5%, Value1="0.192 ohm", Value2=100V, ValueDisplayed=2200pF, AddInBom=yes, AEC Category=Q200, AEC Grade=N/A, AEC Qualified=N, Cap_F=2.2nF, ComponentLink1Description="Datasheet link", ComponentLink1URL=http://datasheets.avx.com/X7RDielectric.pdf, CompType=Capacitor, DesignItemID=CMP-0006736-4, Device=CMP-0006736-4, ESR_ohm=0.192, FootprintName=0603S, LatestRevisionDate=2017-03-09, LibraryName="Altium Vault - TI", MountType=SMT, Origin Footprint=0603, OriginFootprint 2=0603_HV, OriginFootprint 3=0603L, OriginFootprint 4=0603M, PackageReference=0603, PartNumber=06031C222JAT2A, Polarized=N, Published=2008-06-19, Publisher="Texas Instruments", RoHS=Y, SizeArea_mm2=1.28, SizeAreaWB_mm2=4.68, SizeX_mm=1.6, SizeY_mm=0.8, SizeZ_mm=1, Supplier 1=Digi-Key, Supplier 2=Newark, Supplier 3=Mouser, Supplier Part Number 2=96M1245, Supplier Part Number 3=581-06031C222J, Symbol=CMP-0006736-4, TaMax_C=125癈, TaMin_C=-55癈, Technology=Ceramic, U/M=EA, UniqueId=deb55bbe20a101cf, VDC_V=100V
C34 C35 C36: library part CMP-0006723-4, "CAP, CERM, 1000 pF, 100 V, +/- 5%, X7R, 0603", Cap_Case=0603, Manufacturer=AVX, Supplier Part Number 1=478-3698-1-ND, TempCo=X7R, Tolerance_%=5%, Value1="0.276 ohm", Value2=100V, ValueDisplayed=1000pF, AddInBom=yes, AEC Category=Q200, AEC Grade=N/A, AEC Qualified=N, Cap_F=1nF, ComponentLink1Description="Datasheet link", ComponentLink1URL=http://datasheets.avx.com/X7RDielectric.pdf, CompType=Capacitor, DesignItemID=CMP-0006723-4, Device=CMP-0006723-4, ESR_ohm=2.76d, FootprintName=0603S, LatestRevisionDate=2017-03-09, LibraryName="Altium Vault - TI", MountType=SMT, Origin Footprint=0603, OriginFootprint 2=0603_HV, OriginFootprint 3=0603L, OriginFootprint 4=0603M, PackageReference=0603, PartNumber=06031C102JAT2A, Polarized=N, Published=2008-06-19, Publisher="Texas Instruments", RoHS=Y, SizeArea_mm2=1.28, SizeAreaWB_mm2=4.68, SizeX_mm=1.6, SizeY_mm=0.8, SizeZ_mm=1, Supplier 1=Digi-Key, Supplier 2=Newark, Supplier 3=Mouser, Supplier Part Number 2=96M1234, Supplier Part Number 3=581-06031C102J, Symbol=CMP-0006723-4, TaMax_C=125癈, TaMin_C=-55癈, Technology=Ceramic, U/M=EA, VDC_V=100V
  C34: UniqueId=553def7d7947fca6
  C35: UniqueId=2b4e6e580c7acde0
  C36: UniqueId=3db1f6a400993974
C37: library part CMP-0007185-4, "CAP, CERM, 150 pF, 50 V, +/- 5%, C0G/NP0, 0603", Cap_Case=0603, Manufacturer=MuRata, Supplier Part Number 1=490-1431-1-ND, TempCo=C0G/NP0, Tolerance_%=5%, Value1=Unknown, Value2=50V, ValueDisplayed=150pF, AddInBom=yes, AEC Category=Q200, AEC Qualified=?, Cap_F=150pF, ComponentLink1Description="Datasheet link", ComponentLink1URL=http://search.murata.co.jp/Ceramy/PnsearchViewAction.do?HnOFG=ON&HnNFG=ON&SEL_CNT=50&sLang=en&sKey=GRM1885C1H151JA01D&x=9&y=9&search=startwith, CompType=Capacitor, DesignItemID=CMP-0007185-4, Device=CMP-0007185-4, FootprintName=0603S, LatestRevisionDate=2017-03-09, LibraryName="Altium Vault - TI", MountType=SMT, Origin Footprint=0603, OriginFootprint 2=0603_HV, OriginFootprint 3=0603L, OriginFootprint 4=0603M, PackageReference=0603, PartNumber=GRM1885C1H151JA01D, Polarized=N, Published=2008-06-19, Publisher="Texas Instruments", RoHS=Y, SizeArea_mm2=1.28, SizeAreaWB_mm2=4.68, SizeX_mm=1.6, SizeY_mm=0.8, SizeZ_mm=1, Supplier 1=Digi-Key, Supplier 2=Mouser, Supplier 3=Farnell, Supplier Part Number 2=81-GRM39C151J50, Supplier Part Number 3=8819874, Symbol=CMP-0007185-4, TaMax_C=125癈, TaMin_C=-55癈, Technology=Ceramic, U/M=EA, UniqueId=ff078052695da6b6, VDC_V=50V
C38 C39 C40 C41: library part CMP-0007468-5, "CAP, CERM, 0.01 uF, 100 V, +/- 10%, X7R, 0603", Cap_Case=0603, Manufacturer=MuRata, Supplier Part Number 1=GRM188R72A103KA01D-ND, TempCo=X7R, Tolerance_%=10%, Value1=Unknown, Value2=100V, ValueDisplayed=0.01uF, AddInBom=yes, AEC Category=Q200, AEC Qualified=?, Cap_F=10nF, ComponentLink1Description="Datasheet link", ComponentLink1URL=http://search.murata.co.jp/Ceramy/PnsearchViewAction.do?HnOFG=ON&HnNFG=ON&SEL_CNT=50&sLang=en&sKey=GRM188R72A103KA01D&x=9&y=9&search=startwith, CompType=Capacitor, DesignItemID=CMP-0007468-5, Device=CMP-0007468-5, FootprintName=0603S, LatestRevisionDate=2017-03-09, LibraryName="Altium Vault - TI", MountType=SMT, Origin Footprint=0603, OriginFootprint 2=0603_HV, OriginFootprint 3=0603L, OriginFootprint 4=0603M, PackageReference=0603, PartNumber=GRM188R72A103KA01D, Polarized=N, Published=2008-06-19, Publisher="Texas Instruments", RoHS=Y, SizeArea_mm2=1.28, SizeAreaWB_mm2=4.68, SizeX_mm=1.6, SizeY_mm=0.8, SizeZ_mm=1, Supplier 1=Digi-Key, Supplier 2=Mouser, Supplier Part Number 2=81-GRM188R72A103KA1D, Symbol=CMP-0007468-5, TaMax_C=125癈, TaMin_C=-55癈, Technology=Ceramic, U/M=EA, VDC_V=100V
  C38: UniqueId=6827ca7a6bd67e26
  C39: UniqueId=54d3d224326b3f8f
  C40: UniqueId=12af2948e5a85261
  C41: UniqueId=c9655d0faea7d93e
D1 D2: library part DIODE_SMD_SCHOTTKY_B560C, "DIODE, SCHOTTKY, 40V, 3A", =http://www.chila.ir, ASSEMBLY=ASSEMBLY, DESC=DESCRIPTION, MANF=DIODES, MANF_P#=B560C-13-F, PARAM=60V, PARAM2=5A, PRICE=PRICE
D3 D4: library part DIODE_SMD_SCHOTTKY_PMEG6010, "DIODE, SCHOTTKY, 60V, 1A", =http://www.chila.ir, ASSEMBLY=ASSEMBLY, DESC=DESCRIPTION, MANF=NEXPERIA, MANF_P#=PMEG6010AESB, PARAM="1A, -65~150oC", PARAM2="60Vrrm, 0.6Vf", PRICE=0.4$
H1: library part HDR-M_2.54_1x12P, "间距:2.54mm;总PIN位数:12;排数:1;插针结构:1x12P;行距:-;安装类型:直插;圆针/方针:方针;额定电流:3A;额定电压:250V;配合针长度:6mm;塑高:2.5mm;端接针长度:3mm;触头材质:-;工作温度范围:-"
J1 J3: library part CMP-0055387-2, "Standard Banana Jack, Uninsulated, 15A", Manufacturer="Cinch Connectivity", Supplier Part Number 1=J147-ND, AddInBom=yes, CNHeader=FALSE, ComponentLink1Description="Datasheet URL", ComponentLink1URL=http://emersonnetworkpower.com/webapp/wcs/stores/servlet/ESC/resources/1080740001.pdf, CompType="Banana Jack", CT=TRUE, DesignItemID=CMP-0055387-2, Device=CMP-0055387-2, FootprintName=Johnson_108-0740-001, Green_EU RoHS="Passed with Exemption", Green_EU RoHS-2=Passed, Green_Lifecycle=Active, Green_REACh=Passed, LatestRevisionDate=26/05/2017, LibraryName="Altium Vault - TI", MountType=TH, OriginModelName=Johnson_108-0740-001, PackageReference="Banana Jack", PartNumber=108-0740-001, Publisher="Texas Instruments", RoHS=Y, Supplier 1=Digi-Key, Supplier 2=Mouser, Supplier Part Number 2=530-108-0740-1, Symbol=CMP-0055387-2, UniqueId=51bfc0e5166a1c40
J2 J4: library part CMP-0055387-2_1, "Standard Banana Jack, Uninsulated, 15A", Manufacturer="Cinch Connectivity", Supplier Part Number 1=J147-ND, AddInBom=yes, CNHeader=FALSE, ComponentLink1Description="Datasheet URL", ComponentLink1URL=http://emersonnetworkpower.com/webapp/wcs/stores/servlet/ESC/resources/1080740001.pdf, CompType="Banana Jack", CT=TRUE, DesignItemID=CMP-0055387-2, Device=CMP-0055387-2_1, FootprintName=Johnson_108-0740-001, Green_EU RoHS="Passed with Exemption", Green_EU RoHS-2=Passed, Green_Lifecycle=Active, Green_REACh=Passed, LatestRevisionDate=26/05/2017, LibraryName="Altium Vault - TI", MountType=TH, OriginModelName=Johnson_108-0740-001, PackageReference="Banana Jack", PartNumber=108-0740-001, Publisher="Texas Instruments", RoHS=Y, Supplier 1=Digi-Key, Supplier 2=Mouser, Supplier Part Number 2=530-108-0740-1, Symbol=CMP-0055387-2
  J2: UniqueId=1fb9863844ab5169
  J4: UniqueId=7aadee231938cadd
J5: library part CMP-0054801-2, "Header, 2.54 mm, 6x1, Gold, TH", Color=Black, Manufacturer="Wurth Elektronik", Supplier Part Number 1=732-5319-ND, AddInBom=yes, Cert_UL=Y, ClassName=Header, ComponentLink1Description="Datasheet URL", ComponentLink1URL=http://katalog.we-online.de/em/datasheet/6130xx11121.pdf, CompType=Header, ContactFinish=Gold, DesignItemID=CMP-0054801-2, Device=CMP-0054801-2, FootprintName=WURTH_61300611121, Gender=Male, LibraryName="Altium Vault - TI", MountType=TH, Orientation=Vertical, OriginModelName=61300611121, PackageReference="Header, 2.54mm, 6x1, TH", PartNumber=61300611121, PinCount=6, Pitch_mm=2.54, RoHS=Y, Row_Count=1, Shrouded=N, Supplier 1=Digi-Key, Supplier 2=Newark, Supplier 3=Mouser, Supplier Part Number 2=20X0957, Supplier Part Number 3=710-61300611121, Symbol=CMP-0054801-2, UniqueId=188f82074eb8ca32
J6: library part CMP-0054801-2_1, "Header, 2.54 mm, 6x1, Gold, TH", Color=Black, Manufacturer="Wurth Elektronik", Supplier Part Number 1=732-5319-ND, AddInBom=yes, Cert_UL=Y, ClassName=Header, ComponentLink1Description="Datasheet URL", ComponentLink1URL=http://katalog.we-online.de/em/datasheet/6130xx11121.pdf, CompType=Header, ContactFinish=Gold, DesignItemID=CMP-0054801-2, Device=CMP-0054801-2_1, FootprintName=WURTH_61300611121, Gender=Male, LibraryName="Altium Vault - TI", MountType=TH, Orientation=Vertical, OriginModelName=61300611121, PackageReference="Header, 2.54mm, 6x1, TH", PartNumber=61300611121, PinCount=6, Pitch_mm=2.54, RoHS=Y, Row_Count=1, Shrouded=N, Supplier 1=Digi-Key, Supplier 2=Newark, Supplier 3=Mouser, Supplier Part Number 2=20X0957, Supplier Part Number 3=710-61300611121, Symbol=CMP-0054801-2, UniqueId=be1703a8306ee88a
J10: library part CMP-0054794-2, "Header, 2.54 mm, 2x1, Gold, TH", Color=Black, Manufacturer="Wurth Elektronik", Supplier Part Number 1=732-5315-ND, AddInBom=yes, Cert_UL=Y, ClassName=Header, ComponentLink1Description="Datasheet URL", ComponentLink1URL=http://katalog.we-online.de/em/datasheet/6130xx11121.pdf, CompType=Header, ContactFinish=Gold, DesignItemID=CMP-0054794-2, Device=CMP-0054794-2, FootprintName=WURTH_61300211121, Gender=Male, Green_EU RoHS=Passed, Green_EU RoHS-2=Incomplete, Green_Lifecycle=Active, Green_REACh=Passed, LibraryName="Altium Vault - TI", MountType=TH, Orientation=Vertical, OriginModelName=61300211121, PackageReference="Header, 2.54mm, 2x1, TH", PartNumber=61300211121, PinCount=2, Pitch_mm=2.54, RoHS=Y, Row_Count=1, Shrouded=N, Supplier 1=Digi-Key, Supplier 2=Newark, Supplier 3=Mouser, Supplier Part Number 2=20X0948, Supplier Part Number 3=710-61300211121, Symbol=CMP-0054794-2, UniqueId=19810ed2731c20b4
JP1 JP2 JP5 JP7: library part CMP-0054796-4, "Header, 2.54 mm, 3x1, Gold, TH", Manufacturer="Wurth Elektronik", Supplier Part Number 1=732-5316-ND, AddInBom=yes, ClassName=Header, CNHeader=TRUE, ComponentLink1Description="Datasheet URL", ComponentLink1URL=http://katalog.we-online.de/em/datasheet/6130xx11121.pdf, CompType=Header, CT=FALSE, DesignItemID=CMP-0054796-4, Device=CMP-0054796-4, FootprintName=WURTH_61300311121, Green_EU RoHS=Passed, Green_EU RoHS-2=Incomplete, Green_Lifecycle=Active, Green_REACh=Passed, LatestRevisionDate=26/05/2017, LibraryName="Altium Vault - TI", MountType=TH, PackageReference="Header, 2.54mm, 3x1, TH", PartNumber=61300311121, Publisher="Texas Instruments", RoHS=Y, Supplier 1=Digi-Key, Supplier 2=Newark, Supplier 3=Farnell, Supplier Part Number 2=20X0950, Supplier Part Number 3=356154, Symbol=CMP-0054796-4
  JP1: OriginModelName=61300311121, UniqueId=4fe8deccf3ecd12b
  JP2 JP7: Origin 3D Model Title=61300311121
  JP5: OriginModelName=61300311121, UniqueId=7ff5f6d6ea161ff3
JP6: library part CMP-0084909-1, "Header, 2.54mm, 5x1, Gold, TH", Color=Black, Current_A=3A, Manufacturer="Wurth Elektronik", Voltage_V=250V, AddInBom=yes, ClassName=Header, ComponentLink1Description="Datasheet URL", ComponentLink1URL=https://katalog.we-online.de/em/datasheet/6130xx11121.pdf, CompType=Header, ContactFinish=Gold, DesignItemID=CMP-0084909-1, Device=CMP-0084909-1, FootprintName=Wurth_61300511121, Gender=Male, LibraryName="Altium Vault - TI", MountType=TH, Orientation=Vertical, OriginModelName=61300511121, PackageReference="Header, 2.54mm, 5x1, TH", PartNumber=61300511121, PinCount=5, Pitch_mm=2.54, RoHS=Y, Row_Count=1, Shrouded=N, Symbol=CMP-0084909-1, UniqueId=1e4a53fbbd604e66
L1: library part CMP-0063502-1, Manufacturer=Vishay-Dale, PartNumber=IHLP5050FDER1R8M01, Supplier Part Number 1=IHLP5050FDER1R8M01-ND, Value1="0.0032 ohm", Value2=24A, ValueDisplayed=2.8uH, AddInBom=yes, AEC Category=Q200, AEC Qualified=?, ComponentLink1Description="Datasheet link", ComponentLink1URL=http://www.vishay.com/docs/34123/lp50fd01.pdf, CompType=Inductor, DCR_ohm=3.2m, DesignItemID=CMP-0063502-1, Device=CMP-0063502-1, FootprintName=IHLP-5050FD, Green_EU RoHS=Passed, Green_EU RoHS-2=Passed, Green_Lifecycle=Active, Green_REACh=Passed, Imax_A=24A, Ind_H=1.8礖, Irms="24A @ 40C rise", Isat="41A @ 20% inductance drop", LatestRevisionDate=2017-06-02, LibraryName="Altium Vault - TI", Material="Powdered Iron", MountType=SMT, PackageReference=IHLP-5050FD, Published=2008-06-26, Publisher="Texas Instruments", RoHS=Y, SizeArea_mm2=170.28, SizeAreaWB_mm2=226.48, SizeX_mm=13.2, SizeY_mm=12.9, SizeZ_mm=6.5, Supplier 1=Digi-Key, Symbol=CMP-0063502-1, Technology=Shielded, UniqueId=d450ceac7adb81c3
Q1 Q2 Q3 Q4: "数量:1个N沟道;漏源电压(Vdss):100V;连续漏极电流(Id):78A;导通电阻(RDS(on)):12mΩ@4.5V;耗散功率(Pd):125W;阈值电压(Vgs(th)):2.2V;"
R1: library part CMP-0023259-5, "RES, 71.5 k, 1%, 0.1 W, 0603", Manufacturer=Yageo, Power_W=100mW, Supplier Part Number 1=311-71.5KHRCT-ND, TempCo="100 ppm/C", Tolerance_%=1%, Value2=0.1W, Value_Code=71k5, ValueDisplayed=71.5k, AddInBom=yes, AEC Category=Q200, AEC Grade=N/A, AEC Qualified=N, ComponentLink1Description="Datasheet link", ComponentLink1URL=http://www.yageo.com/pdf/Pu-RC0603_51_PbFree_L_2.pdf, CompType=Resistor, DesignItemID=CMP-0023259-5, Device=CMP-0023259-5, EIA_Code=E96, FootprintName=0603S, LibraryName="Altium Vault - TI", MountType=SMT, Origin Footprint=0603, OriginFootprint 2=0603_HV, OriginFootprint 3=0603L, OriginFootprint 4=0603M, PackageReference=0603, PartNumber=RC0603FR-0771K5L, Res_ohm=71.5k, RoHS=Y, SizeArea_mm2=1.28, SizeAreaWB_mm2=4.68, SizeX_mm=1.6, SizeY_mm=0.8, SizeZ_mm=1, Supplier 1=Digi-Key, Supplier 2=Mouser, Supplier Part Number 2=603-RC0603FR-0771K5L, Symbol=CMP-0023259-5, Technology="Thick Film", UniqueId=353b166cc2dee846, Value1=1%, VDC_V=75V
R2: library part ERJ3EKF4751V, "电阻类型:厚膜电阻;阻值:4.75kΩ;精度:±1%;功率:100mW;工作电压:75V;温度系数:±100ppm/℃;"
R3 R4: library part CMP-0090660-1, "4 mOhms -1% 1W Chip Resistor Wide 0805 (2012 Metric), 0508 Automotive AEC-Q200, Current Sense Metal Foil", Digikey Part Number=408-1594-1-ND, Manufacturer=Susumu, Mouser Part Number=754-KRL2012EMR004FT5, Operating Temperature Range="-55癈 to +155癈", Power_W=1W, TempCo=50ppm/癈, Tolerance_%=1%, AddInBom=yes, AEC Grade="Grade 0", AEC Qualified=Yes, ComponentLink1Description=Datasheet, ComponentLink1URL=https://www.susumu.co.jp/common/pdf/n_catalog_partition19_en.pdf?v=20180406, Datasheet=https://www.susumu.co.jp/common/pdf/n_catalog_partition19_en.pdf?v=20180406, Datasheet Path=datasheets/Res-KRL2012E-M-R004-F-T5.pdf, DesignItemID=CMP-0090660-1, Device=CMP-0090660-1, Digikey Description="RES 0.004 OHM 1W 0805 WIDE", FootprintName=FP-KRL2012E-M-R004-F-T5_2012-MFG, helpURL=https://upverter.com/upn/revision/b6c0b371fcd2c6f4/, Lead Free=Yes, LibraryName="Altium Vault - TI", Mouser Description="Current Sense Resistors 0805(Long Side 0508) 1.0W 0.004 Ohm 1% 50Ppm", Origin Footprint=FP-KRL2012E-M-R004-F-T5_2012-IPC_C, OriginFootprint 2=FP-KRL2012E-M-R004-F-T5_2012-IPC_B, OriginFootprint 3=FP-KRL2012E-M-R004-F-T5_2012-IPC_A, OriginModelName=Res_KRL2012E-M-R004-F-T5_2012, PackageReference=2012, Part Number=KRL2012E-M-R004-F-T5, PartNumber=KRL2012E-M-R004-F-T5, Res_ohm=4m, RoHS=TRUE, Series=KRL, SizeZ_mm=0.7mm, Supplier 1=Digikey, Supplier 2=Mouser, Supplier Part Number 1=408-1594-1-ND, Supplier Part Number 2=754-KRL2012EMR004FT5, Symbol=CMP-0090660-1, Technology="Metal Foil"
  R3: UniqueId=fe89d0632cfce75f
  R4: UniqueId=fdc86a4b576d9e98
R5: library part CMP-0023307-5, "RES, 8.25 k, 1%, 0.1 W, 0603", Manufacturer=Yageo, Power_W=100mW, Supplier Part Number 1=311-8.25KHRCT-ND, TempCo="100 ppm/C", Tolerance_%=1%, Value2=0.1W, Value_Code=8k25, ValueDisplayed=8.25k, AddInBom=yes, AEC Category=Q200, AEC Grade=N/A, AEC Qualified=N, ComponentLink1Description="Datasheet link", ComponentLink1URL=http://www.yageo.com/pdf/Pu-RC0603_51_PbFree_L_2.pdf, CompType=Resistor, DesignItemID=CMP-0023307-5, Device=CMP-0023307-5, EIA_Code=E96, FootprintName=0603S, LibraryName="Altium Vault - TI", MountType=SMT, Origin Footprint=0603, OriginFootprint 2=0603_HV, OriginFootprint 3=0603L, OriginFootprint 4=0603M, PackageReference=0603, PartNumber=RC0603FR-078K25L, Res_ohm=8.25k, RoHS=Y, SizeArea_mm2=1.28, SizeAreaWB_mm2=4.68, SizeX_mm=1.6, SizeY_mm=0.8, SizeZ_mm=1, Supplier 1=Digi-Key, Supplier 2=Mouser, Supplier 3=Farnell, Supplier Part Number 2=603-RC0603FR-078K25L, Supplier Part Number 3=9238590, Symbol=CMP-0023307-5, Technology="Thick Film", Value1=1%, VDC_V=75V
R6: library part JER2512F3R006, "电阻类型:采样电阻；合金电阻;阻值:6mΩ;精度:±1%;功率:3W;温度系数:±50ppm/℃;安装方式:贴片;"
R7 R8 R9 R10 R13 R39: library part CMP-0025804-4, "RES, 3.0, 5%, 0.1 W, AEC-Q200 Grade 0, 0603", Manufacturer=Vishay-Dale, Power_W=100mW, Supplier Part Number 1=541-3.0GCT-ND, TempCo="200 ppm/C", Tolerance_%=5%, Value2=0.1W, Value_Code=3R00, ValueDisplayed=3.0, AddInBom=yes, AEC Category=Q200, AEC Grade=0, AEC Qualified=Y, ComponentLink1Description="Datasheet link", ComponentLink1URL=http://www.vishay.com/docs/20035/dcrcwe3.pdf, CompType=Resistor, DesignItemID=CMP-0025804-4, Device=CMP-0025804-4, EIA_Code=E24, FootprintName=0603S, LibraryName="Altium Vault - TI", MountType=SMT, Origin Footprint=0603, OriginFootprint 2=0603_HV, OriginFootprint 3=0603L, OriginFootprint 4=0603M, PackageReference=0603, PartNumber=CRCW06033R00JNEA, Res_ohm=3, RoHS=E, SizeArea_mm2=1.28, SizeX_mm=1.6, SizeY_mm=0.8, SizeZ_mm=1, Supplier 1=Digi-Key, Supplier 2=Newark, Supplier 3=Mouser, Supplier Part Number 2=47P3561, Supplier Part Number 3=71-CRCW0603J-3-E3, Symbol=CMP-0025804-4, Technology="Thick Film", Value1=5%, VDC_V=75V
  R7: UniqueId=ba2c6d155e7fd301
  R8: UniqueId=86d447fa2a9c8586
  R9: UniqueId=1e1ffada38203b9e
  R10: UniqueId=41bc0941336b1513
  R13: UniqueId=ff4077a9ca69db92
  R39: UniqueId=61aee2c7162d13e5
R11 R12: library part CMP-0084243-1, "RES, 100, 1%, 0.25 W, AEC-Q200 Grade 0, 0603", Manufacturer=Vishay-Dale, Power_W=250mW, TempCo="100 ppm/C", Tolerance_%=1%, Value2=0.25W, Value_Code=100R, ValueDisplayed=10, AddInBom=yes, AEC Category=Q200, AEC Grade=0, AEC Qualified=Y, ComponentLink1Description="Datasheet link", ComponentLink1URL=http://www.vishay.com/docs/20043/crcwhpe3.pdf, CompType=Resistor, DesignItemID=CMP-0084243-1, Device=CMP-0084243-1, EIA_Code=E96, FootprintName=0603S, LibraryName="Altium Vault - TI", MountType=SMT, Origin Footprint=0603, OriginFootprint 2=0603M, OriginFootprint 3=0603L, OriginFootprint 4=0603_HV, PackageReference=0603, PartNumber=CRCW0603100RFKEAHP, Res_ohm=100, RoHS=Y, SizeArea_mm2=1.28, SizeAreaWB_mm2=4.68, SizeX_mm=1.6, SizeY_mm=0.8, SizeZ_mm=1, Symbol=CMP-0084243-1, Technology="Thick Film", Value1=1%
  R11: UniqueId=763cf8d5648cb4fd
  R12: UniqueId=15ac9218146e0f4b
R14: library part FRC0603F1783TS, "电阻类型:厚膜电阻;阻值:178kΩ;精度:±1%;功率:100mW;工作电压:75V;温度系数:±100ppm/℃;"
R15: library part 0603WAF2322T5E, "电阻类型:厚膜电阻;阻值:23.2kΩ;精度:±1%;功率:100mW;工作电压:75V;温度系数:±100ppm/℃;"
R16: library part CMP-0023653-3, "RES, 10.0 k, 0.1%, 0.1 W, 0603", Manufacturer="Yageo America", Power_W=100mW, TempCo="25 ppm/C", Tolerance_%=0.1%, Value2=0.1W, Value_Code=10k0, ValueDisplayed=10.0k, AddInBom=yes, AEC Category=Q200, AEC Qualified=?, ComponentLink1Description="Datasheet link", ComponentLink1URL=http://www.yageo.com/pdf/PYu-RT_1-to-0.05_RoHS_L_3.pdf, CompType=Resistor, DesignItemID=CMP-0023653-3, Device=CMP-0023653-3, EIA_Code=E192, FootprintName=0603S, LatestRevisionDate=2017-03-09, LibraryName="Altium Vault - TI", MountType=SMT, Origin Footprint=0603, OriginFootprint 2=0603_HV, OriginFootprint 3=0603L, OriginFootprint 4=0603M, PackageReference=0603, PartNumber=RT0603BRD0710KL, Published=2008-06-26, Publisher="Texas Instruments", Res_ohm=10k, RoHS=Y, SizeArea_mm2=1.28, SizeX_mm=1.6, SizeY_mm=0.8, SizeZ_mm=1, Symbol=CMP-0023653-3, Technology="Thin Film", U/M=EA, UniqueId=3c543c7c58e1cc80, Value1=0.1%, VDC_V=75V
R17: library part RT0603BRD0760KL, "电阻类型:薄膜电阻;阻值:60kΩ;精度:±0.1%;功率:100mW;工作电压:75V;温度系数:±25ppm/℃;"
R18 R22 R23 R24 R25 R26 R27 R28 R29 R30 R31 R32 R33 R40 R41 R42 R43 R44 R46 R47 R48 R49: library part CMP-0023343-3, "RES, 0, 1%, 0.1 W, AEC-Q200 Grade 0, 0603", Manufacturer="Stackpole Electronics Inc", Power_W=100mW, Supplier Part Number 1=RMCF0603ZT0R00CT-ND, TempCo=ppm/C, Tolerance_%=1%, Value2=0.1W, Value_Code=0, AddInBom=yes, AEC Category=Q200, AEC Grade=0, AEC Qualified=Y, ComponentLink1Description="Datasheet link", ComponentLink1URL=https://www.seielect.com/Catalog/SEI-RMCF_RMCP.pdf, CompType=Resistor, DesignItemID=CMP-0023343-3, Device=CMP-0023343-3, FootprintName=0603S, LatestRevisionDate=2017-03-09, LibraryName="Altium Vault - TI", MountType=SMT, Origin Footprint=0603, OriginFootprint 2=0603_HV, OriginFootprint 3=0603L, OriginFootprint 4=0603M, PackageReference=0603, PartNumber=RMCF0603ZT0R00, Published=2008-06-26, Publisher="Texas Instruments", Res_ohm=0, RoHS=Y, SizeArea_mm2=1.28, SizeX_mm=1.6, SizeY_mm=0.8, SizeZ_mm=1, Supplier 1=Digi-Key, Symbol=CMP-0023343-3, Technology="Thick Film", U/M=EA, Value1=1%, ValueDisplayed=0
  R40: UniqueId=5d7d37af6db8001c
  R41: UniqueId=e262797b4e338b99
  R42: UniqueId=3520350cb8a16ddf
  R43: UniqueId=1ad54b734ffff27e
  R44: UniqueId=3f1747bc7cd0165c
  R46: UniqueId=9e0eccf13a6f31a8
  R47: UniqueId=1887dacec97403d3
  R49: UniqueId=086d1dd8ac2c5fca
R19: library part FRC0603F4991TS, "电阻类型:厚膜电阻;阻值:4.99kΩ;精度:±1%;功率:100mW;工作电压:75V;温度系数:±100ppm/℃;"
R20: library part FRC0603F6982TS, "电阻类型:厚膜电阻;阻值:69.8kΩ;精度:±1%;功率:100mW;工作电压:75V;温度系数:±100ppm/℃;"
R21: library part FRC0603F7502TS, "电阻类型:厚膜电阻;阻值:75kΩ;精度:±1%;功率:100mW;工作电压:75V;温度系数:±100ppm/℃;"